# Altium PCB OFS-BOARD.PcbDoc (part 2 of 2)
Units mm, origin at the board's own origin, x right, y up, seen from the top; angles counter-clockwise.
Board outline 131.85 x 70.25 mm, 4 copper layers (Top Layer, Power, GND, Bottom Layer), stack 0.603 mm thick; 110 components, 67 nets, 411 pads, 420 vias.
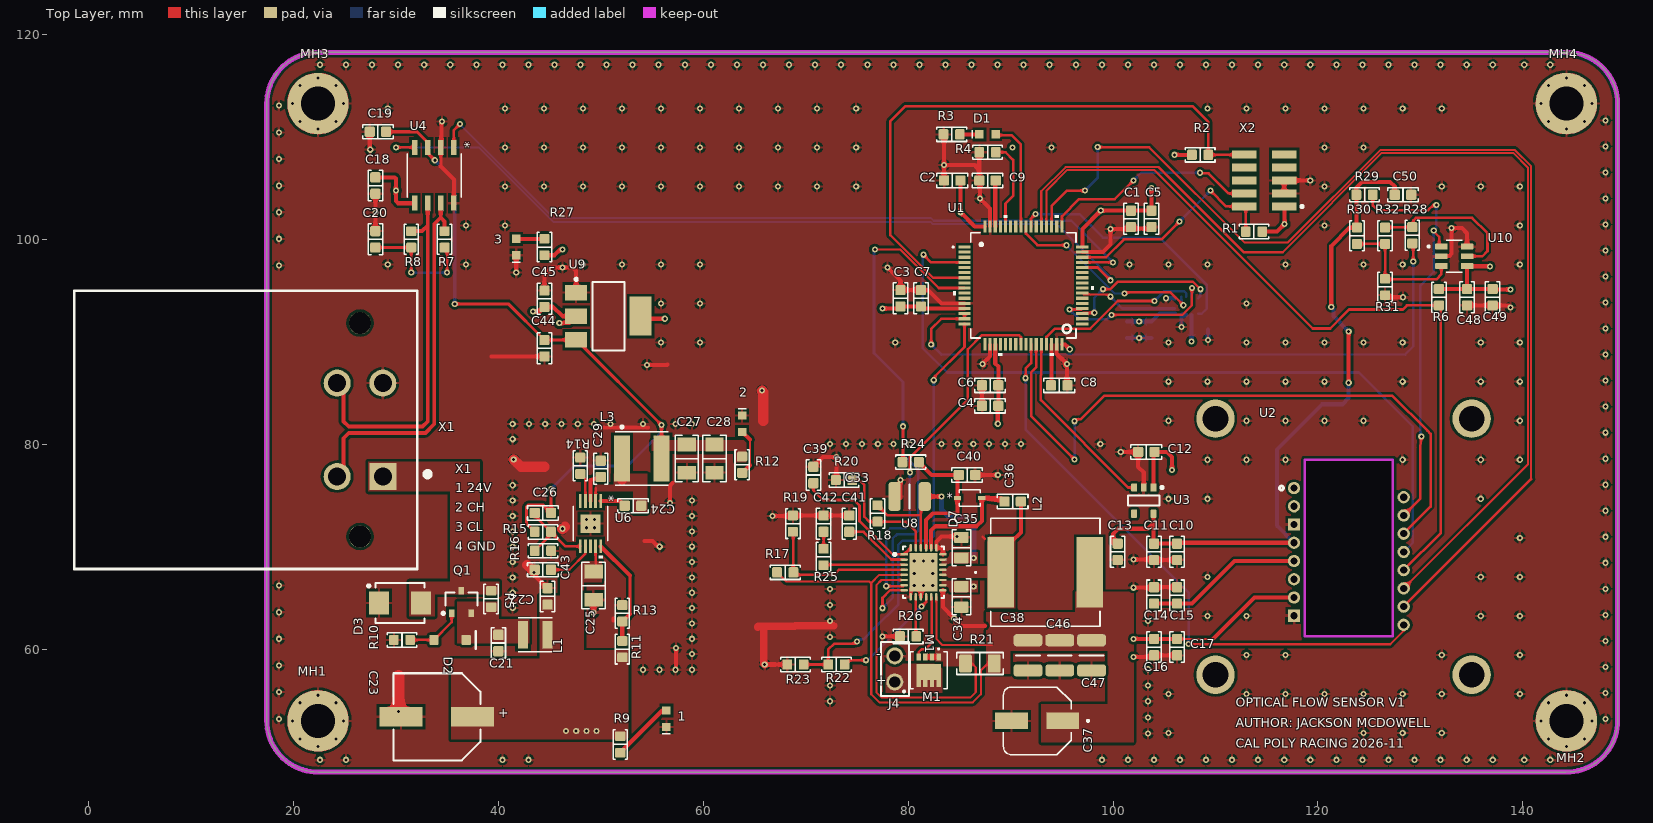
[diagram p0: Top Layer view]

## Polygon pours and split planes (outlines as drawn) (continued)
24V_Unfiltered on Top Layer "PWR_24V_UNF" (solid, pour order 5): 36,60.6 43,60.6 43,62.9 40.05,62.9 40.05,64.65 36,64.65
24V_HARNESS on Top Layer "PWR_24V_HARNESS" (solid, pour order 4): 31.3,63.2 33.8,63.2 33.8,65.35 40.1,65.35 40.1,66.6 38.2,66.6 38.2,78.3 35.3,78.3 35.3,66.6 31.3,66.6
GND on Bottom Layer "Bottom Layer-GND" (solid, remove dead copper, pour order 26): 22.4,48 144.25,48 ccw(c144.25,53) 149.25,53 149.25,113.25 ccw(c144.25,113.25) 144.25,118.25 22.4,118.25 ccw(c22.4,113.25) 17.4,113.25 17.4,53 ccw(c22.4,53)
24V on Bottom Layer "PWR_24V_BOT" (solid, remove dead copper, pour order 17): 45.9,49 87.3,49 87.3,69.4 85.6,69.4 85.6,54 45.9,54
GND on Power "Power-GND" (solid, remove dead copper, pour order 27): 22.4,48 144.25,48 ccw(c144.25,53) 149.25,53 149.25,113.25 ccw(c144.25,113.25) 144.25,118.25 22.4,118.25 ccw(c22.4,113.25) 17.4,113.25 17.4,53 ccw(c22.4,53)
3V3 on GND "GND-3V3" (solid, remove dead copper, pour order 28): 22.4,48 144.25,48 ccw(c144.25,53) 149.25,53 149.25,113.25 ccw(c144.25,113.25) 144.25,118.25 22.4,118.25 ccw(c22.4,113.25) 17.4,113.25 17.4,53 ccw(c22.4,53)

## Keep-outs
Keep-Out Layer:
  the board outline again, w0.508

## Silkscreen, mask and mechanical layers (free items; w line width, h text height)
Top Overlay:
  text "X1" at 35.8,76.9 h1.5
  text "1 24V" at 35.8,75 h1.5
  text "2 CH" at 35.8,73.1 h1.5
  text "3 CL" at 35.8,71.2 h1.5
  text "4 GND" at 35.8,69.3 h1.5
  text "-" at 76.9,58.8 h1.5
  text "+" at 76.9,56.25 h1.5
  text "OPTICAL FLOW SENSOR V1" at 112,54.1 h1.5
  text "AUTHOR: JACKSON MCDOWELL" at 112,52.1 h1.5
  text "CAL POLY RACING 2026-11" at 112,50.1 h1.5

## Text inside footprints (layer, text, board x,y; h text height)
C23: Top Overlay "+" at 40.001,53.06 h1.5
D7: Top Overlay "*" at 83.755,74.115 h1.5; Mechanical 13 "*" at 85.035,74.115 h1.27
U4: Top Overlay "*" at 36.087,109.546 h1.5 r270; Mechanical 13 "*" at 34.906,108.18 h1.27 r270
U6: Top Overlay "*" at 50.152,75.038 h1.5 r270
U7: Mechanical 13 "*" at 108.346,93.865 h1.27; Bottom Overlay "*" at 109.959,94.643 h1.5